# Altium PCB PCB1.PcbDoc
Units mm, origin at the board's own origin, x right, y up, seen from the top; angles counter-clockwise.
Board outline 80.1 x 59.37 mm, 2 copper layers (Top Layer, Bottom Layer); 8 components, 8 nets, 54 pads, 0 vias.
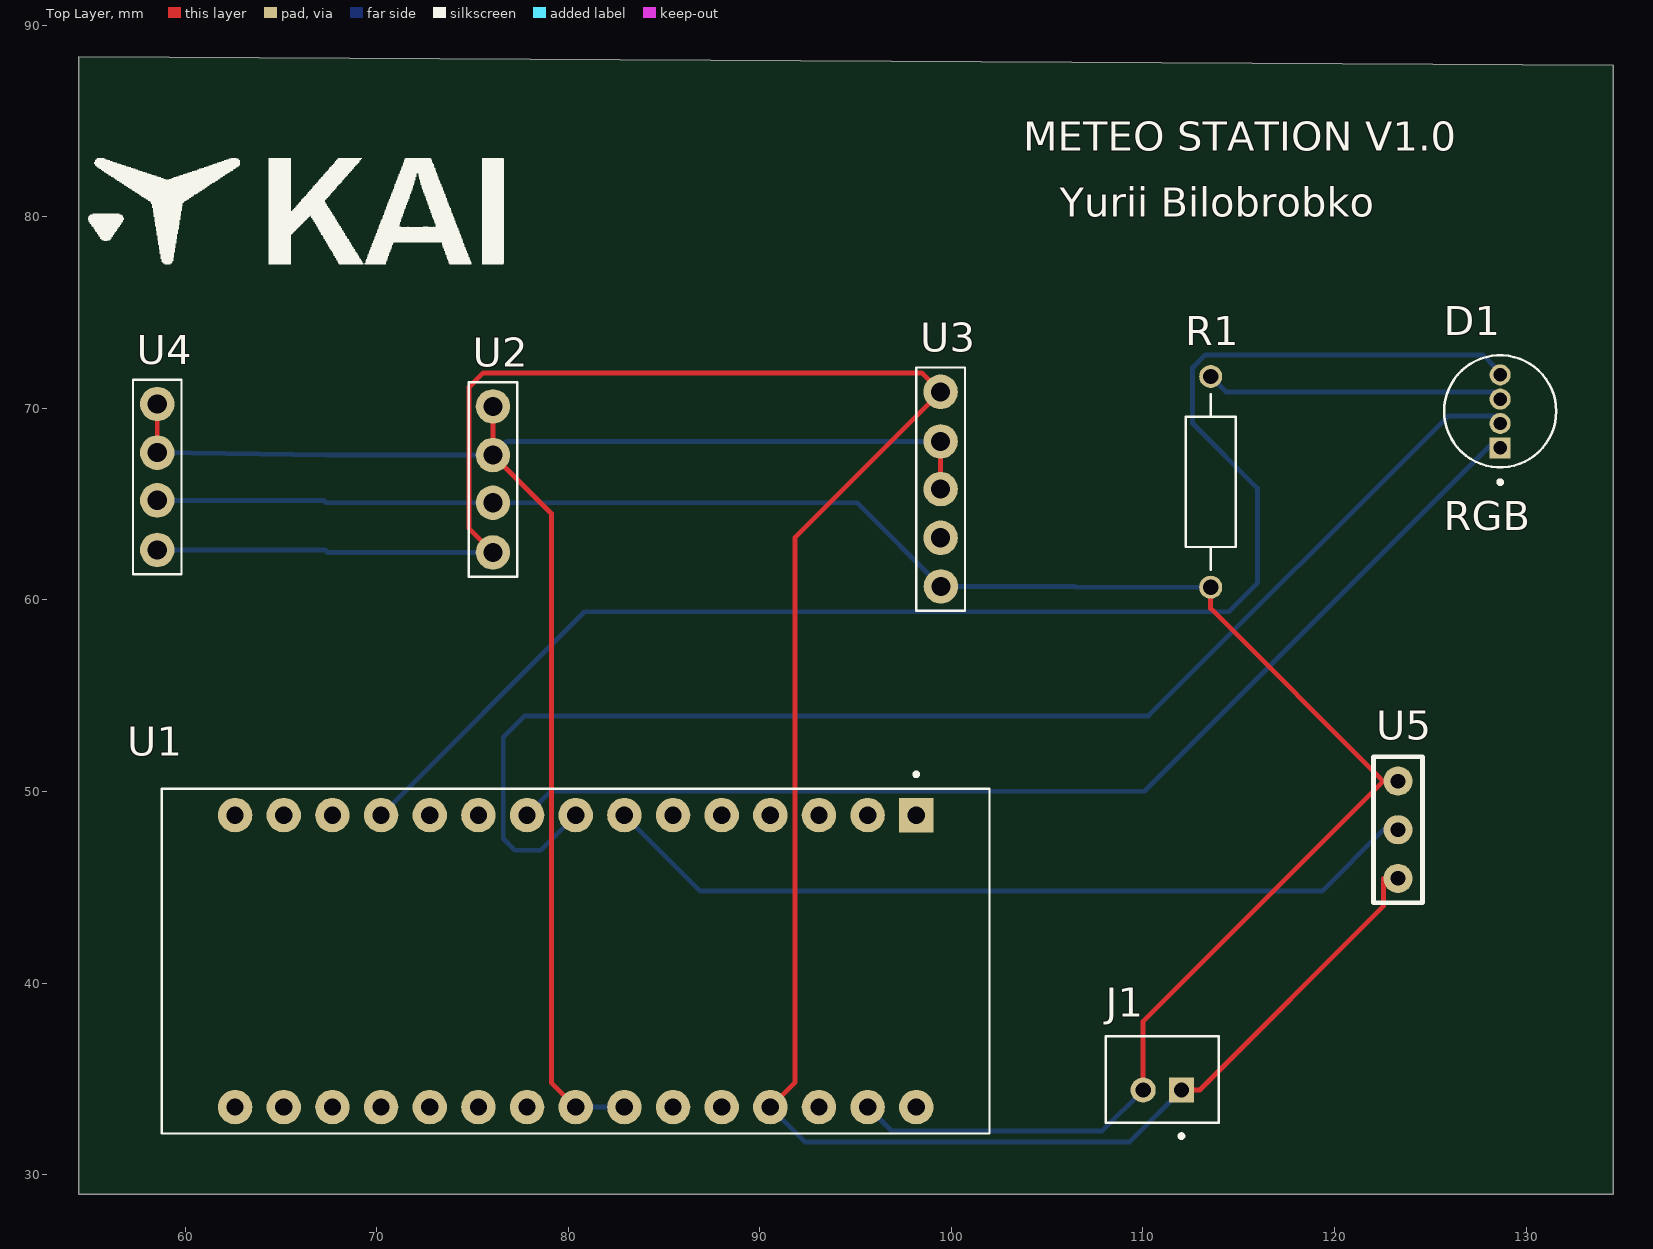
[diagram p0: Top Layer view]
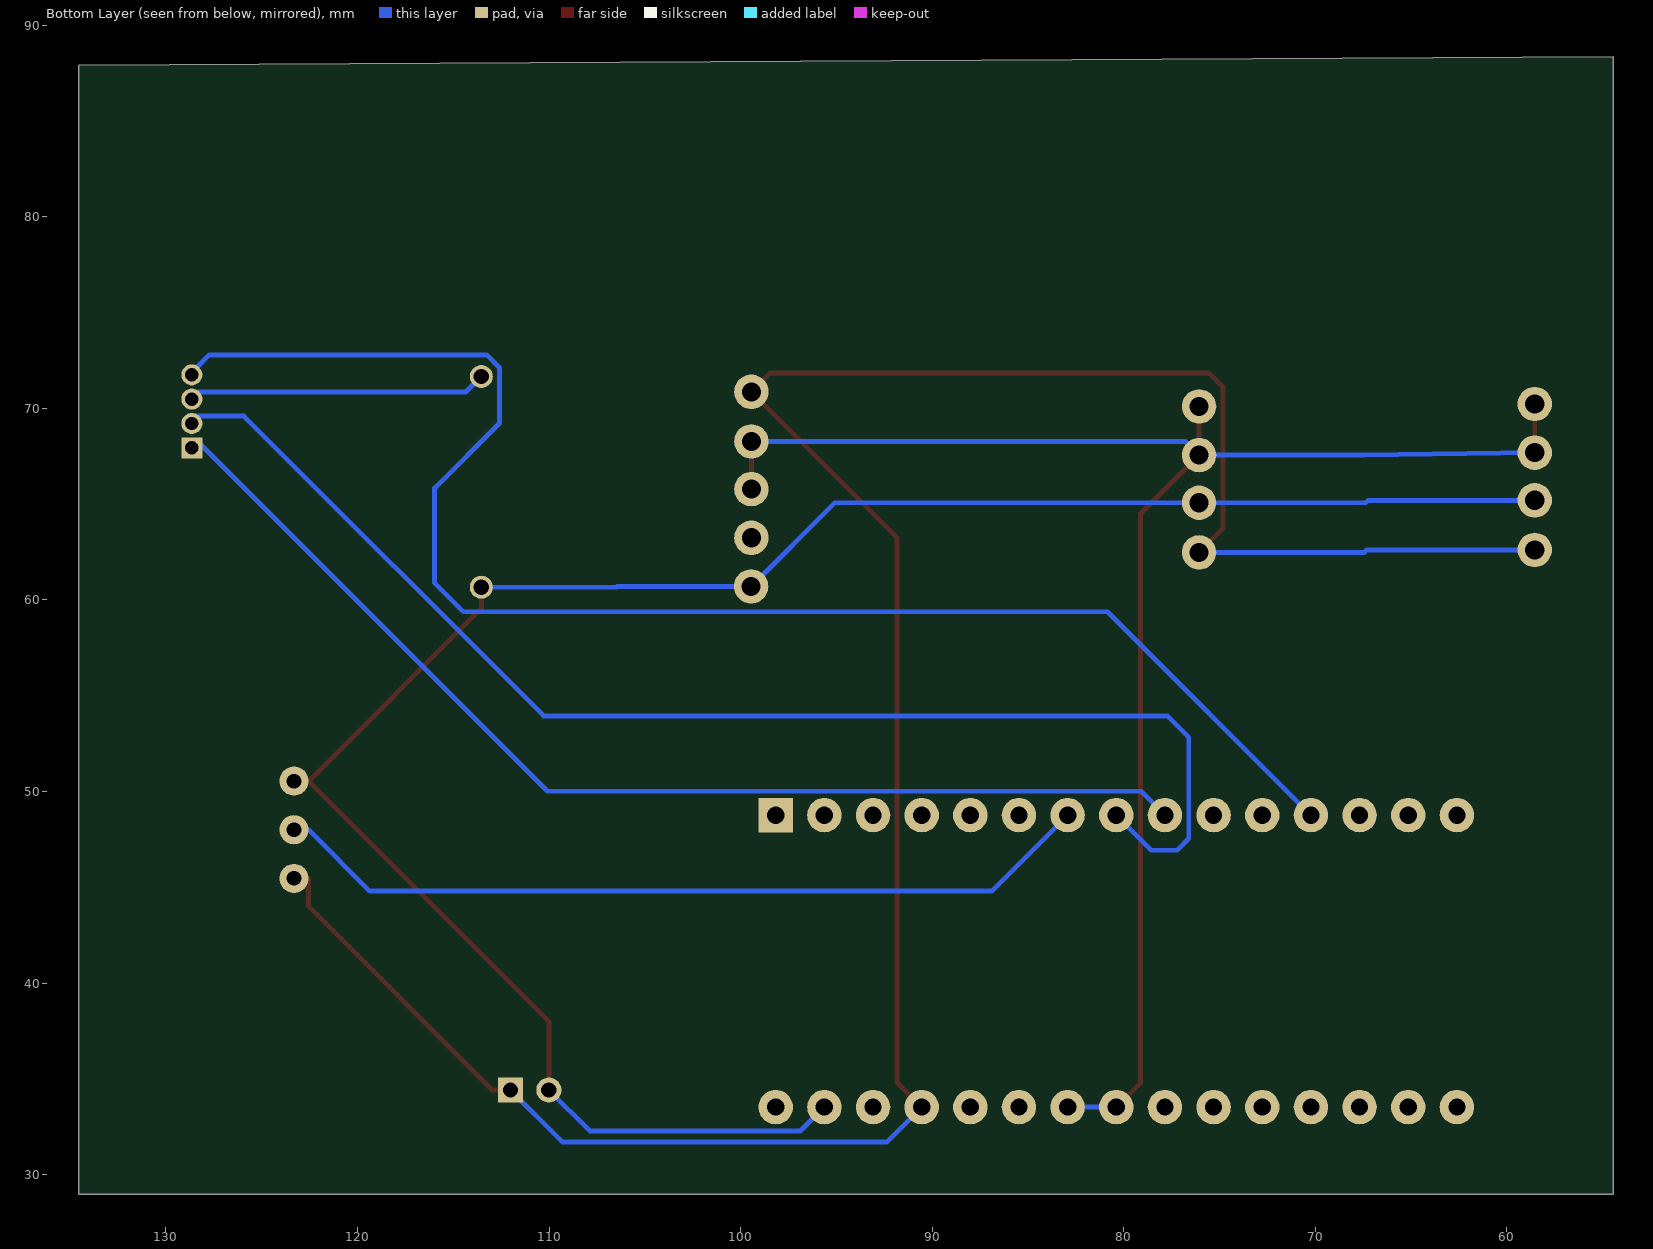
[diagram p1: Bottom Layer view, seen from below]
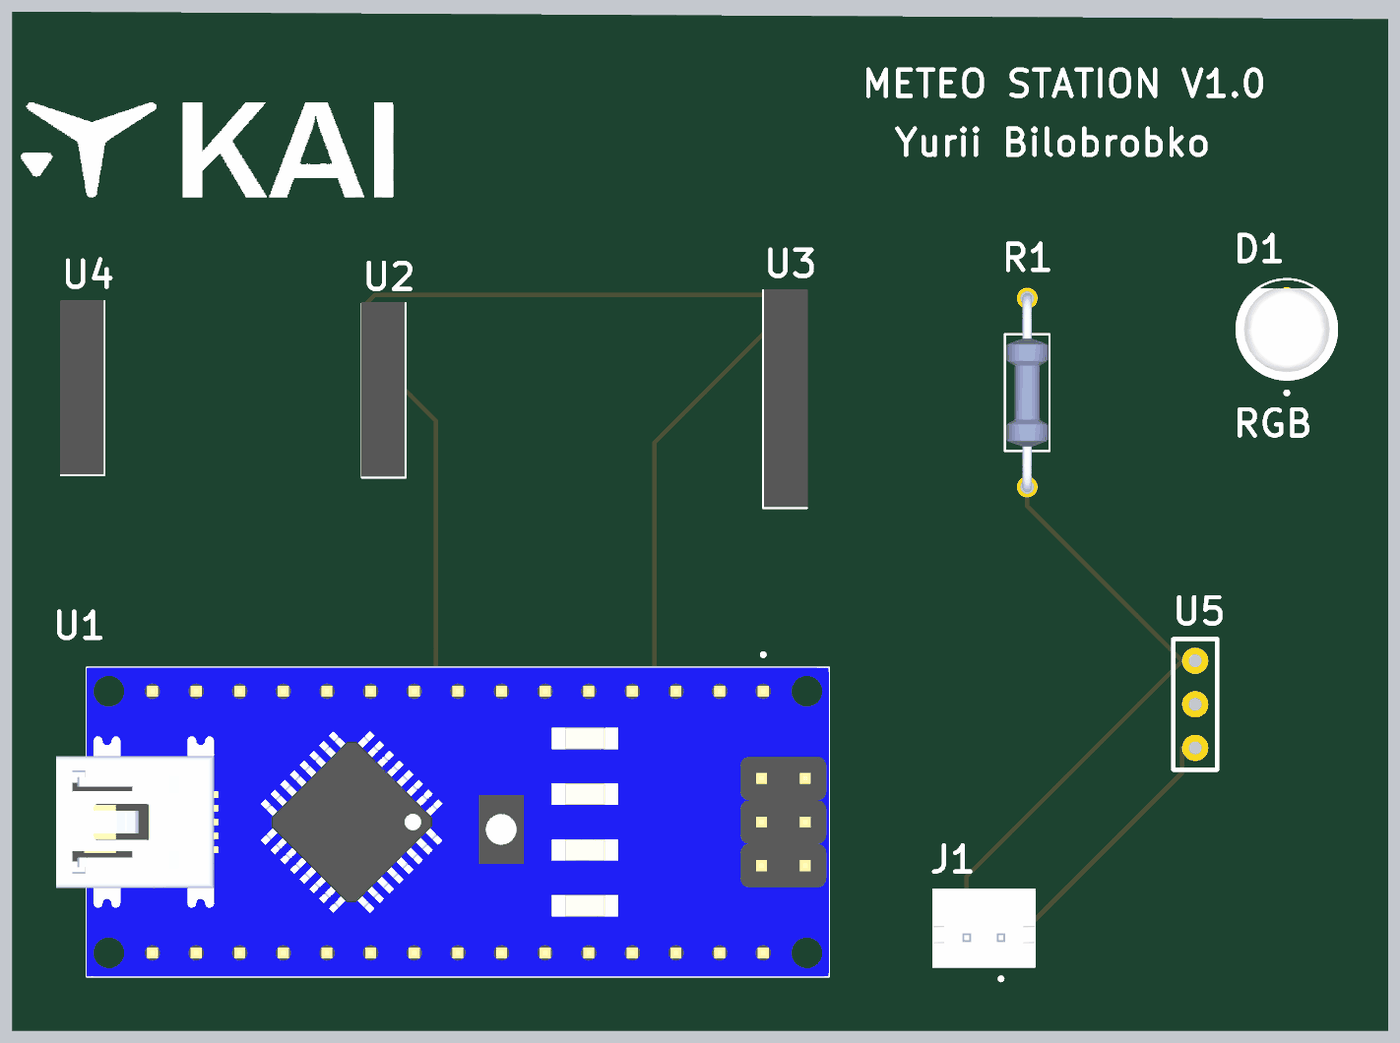
[diagram p2: 3D render of the assembled board from above, using the file's embedded part models]

## Layer stack, top to bottom
Top Solder: solder mask 0.0102, Solder Resist, Dk 3.5
Top Layer: signal copper 0.0356
Dielectric 1: dielectric 0.32, FR-4, Dk 4.8
Bottom Layer: signal copper 0.0356
Bottom Solder: solder mask 0.0102, Solder Resist, Dk 3.5

## Board outline
54.449,28.984 134.553,28.984 134.553,87.921 54.449,88.358

## Design rules (kind name [scope] priority, off if disabled: settings)
Clearance [All] p1: gap=0.2 ignorepadtopadclearanceinfootprint=TRUE
MinimumSolderMaskSliver [All] p1: minsoldermaskwidth=0.15
PolygonConnect [All] p1: connectstyle=Relief reliefconductorwidth=0.254 reliefentries=4 polygonreliefangle="90 Angle" airgapwidth=0.254
RoutingVias [All] p1: holewidth=0.4 width=0.8 viastyle="Through Hole" minholewidth=0.711 minwidth=1.27 maxholewidth=0.711 maxwidth=1.27
SolderMaskExpansion [All] p1: expansion=0 istentingtop=FALSE
Width "Power wight" [InNet('Net1_1') Or InNet('Net1_2')] p1: maxlimit=0.8 minlimit=0.4 preferedwidth=0.6
Width Width_sgn [All] p2: maxlimit=0.254 minlimit=0.254 preferedwidth=0.254
29 further rules are at their usual default settings.

## Components (designator, comment, footprint, x,y, rotation, side; value= is the part's Value field where it differs from the comment)
D1 "RGB" RGB 129.616,75.095 r90 top
J1 "B2B-PH-K-S(LF)(SN)" JST_B2B-PH-K-S(LF)(SN) 111.014,34.967 r0 top
R1 "220" RES 113.538,66.167 r90 top
U1 "ARDUINO_NANO" MODULE_ARDUINO_NANO 80.391,41.148 r270 top
U2 "BME280" PBS_1X4_P2.54 76.073,62.484 r90 top
U3 "PBS_1X5" PBS_1X5_P2.54 99.441,70.866 r270 top
U4 "PBS_1X4" PBS_1X4_P2.54 58.547,62.611 r90 top
U5 "TTP223" TTP223 123.317,45.466 r90 top

## Footprints (in the part's own frame and the unit in brackets; to place one, negate y for a bottom-side part, rotate by r counter-clockwise, add the part's x,y. Pads: shape width x height; smd on the part's side, far side on the other; paste and mask are expansions set on the pad)
JST_B2B-PH-K-S(LF)(SN) [mm]
  rect 1.308x1.308 / inner round 1.308 / far side rect 1.308x1.308 hole 0.8: 1(1,-0.55)
  round 1.308 hole 0.8: 2(-1,-0.55)
  silkscreen extent -2.95,-3.05 2.95,2.25, body extent -2.95,-2.25 2.95,2.25, height 6
MODULE_ARDUINO_NANO [mm]
  rect 1.8x1.8 / inner round 1.8 / far side rect 1.8x1.8 hole 0.9: 1(-7.62,17.78)
  round 1.8 hole 0.9: 2(-7.62,15.24) 3(-7.62,12.7) 4(-7.62,10.16) 5(-7.62,7.62) 6(-7.62,5.08) 7(-7.62,2.54) 8(-7.62,0) 9(-7.62,-2.54) 10(-7.62,-5.08) 11(-7.62,-7.62) 12(-7.62,-10.16) 13(-7.62,-12.7) 14(-7.62,-15.24) 15(-7.62,-17.78) 16(7.62,-17.78) 17(7.62,-15.24) 18(7.62,-12.7) 19(7.62,-10.16) 20(7.62,-7.62) 21(7.62,-5.08) 22(7.62,-2.54) 23(7.62,0) 24(7.62,2.54) 25(7.62,5.08) 26(7.62,7.62) 27(7.62,10.16) 28(7.62,12.7) 29(7.62,15.24) 30(7.62,17.78)
  silkscreen extent -9.85,-21.6 9,21.6, body extent -9,-23.4 9,21.6, height 12.6
PBS_1X4_P2.54 [mm]
  round 1.8 hole 1: 1(0,0) 2(2.592,0) 3(5.08,0) 4(7.62,0)
  silkscreen extent -1.27,-1.27 8.89,1.27, body extent -1.21,-1.23 8.95,1.31, height 8.4
PBS_1X5_P2.54 [mm]
  round 1.8 hole 1: 1(0,0) 2(2.592,0) 3(5.08,0) 4(7.62,0) 5(10.16,0.013)
  silkscreen extent -1.27,-1.27 11.43,1.27, body extent -1.32,-1.23 11.38,1.31, height 8.4
RES [mm]
  round 1.2 hole 0.8: 1(-5.5,0) 2(5.5,0)
  silkscreen extent -4.58,-1.3 4.58,1.3, body extent -5.77,-1.2 5.77,1.2, height 2.4
RGB [mm]
  rect 1.1x1.1 / inner round 1.1 / far side rect 1.1x1.1 hole 0.7: 1(-7.15,0.965)
  round 1.1 hole 0.7: 2(-5.88,0.965) 3(-4.61,0.965) 4(-3.34,0.965)
  silkscreen extent -9.04,-1.96 -2.32,3.89, body extent -8.17,-1.96 -2.84,3.89, height 8.65
TTP223 [mil]
  round 60 hole 30: 1(0,0) 2(100,0) 3(200,0)
  silkscreen extent -50,-50 250,50

## Part data
D1: Package="Radial QT Brightek (QTB)", Check_prices=https://www.snapeda.com/parts/QBL8RGB60D0-2897/QT/view-part/?ref=eda, MF="QT Brightek (QTB)", MP=QBL8RGB60D0-2897, SnapEDA_Link=https://www.snapeda.com/parts/QBL8RGB60D0-2897/QT/view-part/?ref=snap
J1: "Connector Header Through Hole 2 position 0.079 (2.00mm)", Package=None, Check_prices=https://www.snapeda.com/parts/B2B-PH-K-S%20(LF)(SN)/JST/view-part/?ref=eda, MF=JST, MP="B2B-PH-K-S (LF)(SN)", SnapEDA_Link=https://www.snapeda.com/parts/B2B-PH-K-S%20(LF)(SN)/JST/view-part/?ref=snap
R1: library part RES, Package="RADIAL-2 YAGEO", Check_prices=https://www.snapeda.com/parts/MFR-25FBF52-1K/Yageo/view-part/?ref=eda, MF=Yageo, MP=MFR-25FBF52-1K, SnapEDA_Link=https://www.snapeda.com/parts/MFR-25FBF52-1K/Yageo/view-part/?ref=snap
U1: "Small, complete, and breadboard-friendly board based on the ATmega328 (Arduino Nano 3.x)", Package="Non-Standard Arduino", Check_prices=https://www.snapeda.com/parts/Arduino%20Nano/Arduino/view-part/?ref=eda, MF=Arduino, MP="Arduino Nano", SnapEDA_Link=https://www.snapeda.com/parts/Arduino%20Nano/Arduino/view-part/?ref=snap
U2: library part PBS_1X4

## Nets (pads, with @x,y where several pads share a name; then routed paths per layer and width w, separated by ;. In a path a pad name is that pad's centre, name@x,y a point inside that pad or via, vN(x,y) a via of type N, cw(c..) or ccw(c..) an arc to the next point about the centre after c; other vN are vias at no path point)
Net_OUT: U1.7 U5.2 | length 42.6
  Bottom Layer w0.254: U1.7 86.893,44.806 119.355,44.806 U5.2@122.555,48.006
NetD1_1: D1.1 U1.9 | length 58.6
  Bottom Layer w0.254: U1.9 79.096,50.013 110.084,50.013 D1.1@128.397,68.326
NetD1_2: D1.2 U1.8 | length 68.8
  Bottom Layer w0.254: U1.8 78.562,46.939 77.216,46.939 76.606,47.549 76.606,52.832 77.724,53.95 110.287,53.95 125.933,69.596 D1.2@128.397,69.596
NetD1_3: D1.3 R1.2 | length 15.2
  Bottom Layer w0.254: R1.2 114.339,70.866 D1.3@128.397,70.866
NetD1_4: D1.4 U1.12 | length 79.8
  Bottom Layer w0.254: U1.12 80.848,59.385 114.478,59.385 115.976,60.884 115.976,65.837 112.598,69.215 112.598,72.136 113.259,72.796 127.737,72.796 D1.4@128.397,72.136
NetJ1_1: J1.1 U1.27 U2.1 U3.1 U4.1 U5.1 | length 132.4
  Top Layer w0.254: U2.1 74.828,63.729 74.828,71.12 75.565,71.857 98.45,71.857 U3.1 91.846,63.271 91.846,34.823 U1.27 ; J1.1 112.954,34.417 122.555,44.018 U5.1@122.555,45.466
  Bottom Layer w0.254: U4.1 67.31,62.611 67.437,62.484 U2.1 ; U1.27 92.38,31.699 109.296,31.699 J1.1
NetJ1_2: J1.2 R1.1 U1.29 U2.2 U3.5 U4.2 U5.3 | length 107.8
  Top Layer w0.254: J1.2 110.014,38.005 122.555,50.546 113.538,59.563 R1.1
  Bottom Layer w0.254: U4.2 67.234,65.203 67.361,65.076 U2.2 95.084,65.076 U3.5 106.451,60.706 106.49,60.667 R1.1 ; U1.29 96.876,32.283 107.88,32.283 J1.2
NetU1_23: U1.23 U1.24 U2.3 U2.4 U3.2 U3.3 U4.3 U4.4 | length 87.1
  Top Layer w0.254: U4.3 U4.4 ; U2.4 U2.3 79.121,64.516 79.121,34.798 U1.23 ; U3.3 U3.2
  Bottom Layer w0.254: U4.3 67.437,67.564 U2.3 76.783,68.274 U3.2 ; U1.23 U1.24
pads on no net: U1.1 U1.2 U1.3 U1.4 U1.5 U1.6 U1.10 U1.11 U1.13 U1.14 U1.15 U1.16 U1.17 U1.18 U1.19 U1.20 U1.21 U1.22 U1.25 U1.26 U1.28 U1.30 U3.4

## Silkscreen, mask and mechanical layers (free items; w line width, h text height)
Top Overlay:
  drawing of 5 lines, arcs and shapes, not listed
  text "METEO STATION V1.0" at 103.759,83.439 h1.52
  text "Yurii Bilobrobko" at 105.664,80.01 h1.52